# Altium PCB PCB_Z35_Sensors.PcbDoc
Units mm, origin at the board's own origin, x right, y up, seen from the top; angles counter-clockwise.
Board outline 19.94 x 36.96 mm, 2 copper layers (Top Layer, Bottom Layer), stack 1.671 mm thick; 9 components, 185 nets, 31 pads, 11 vias.
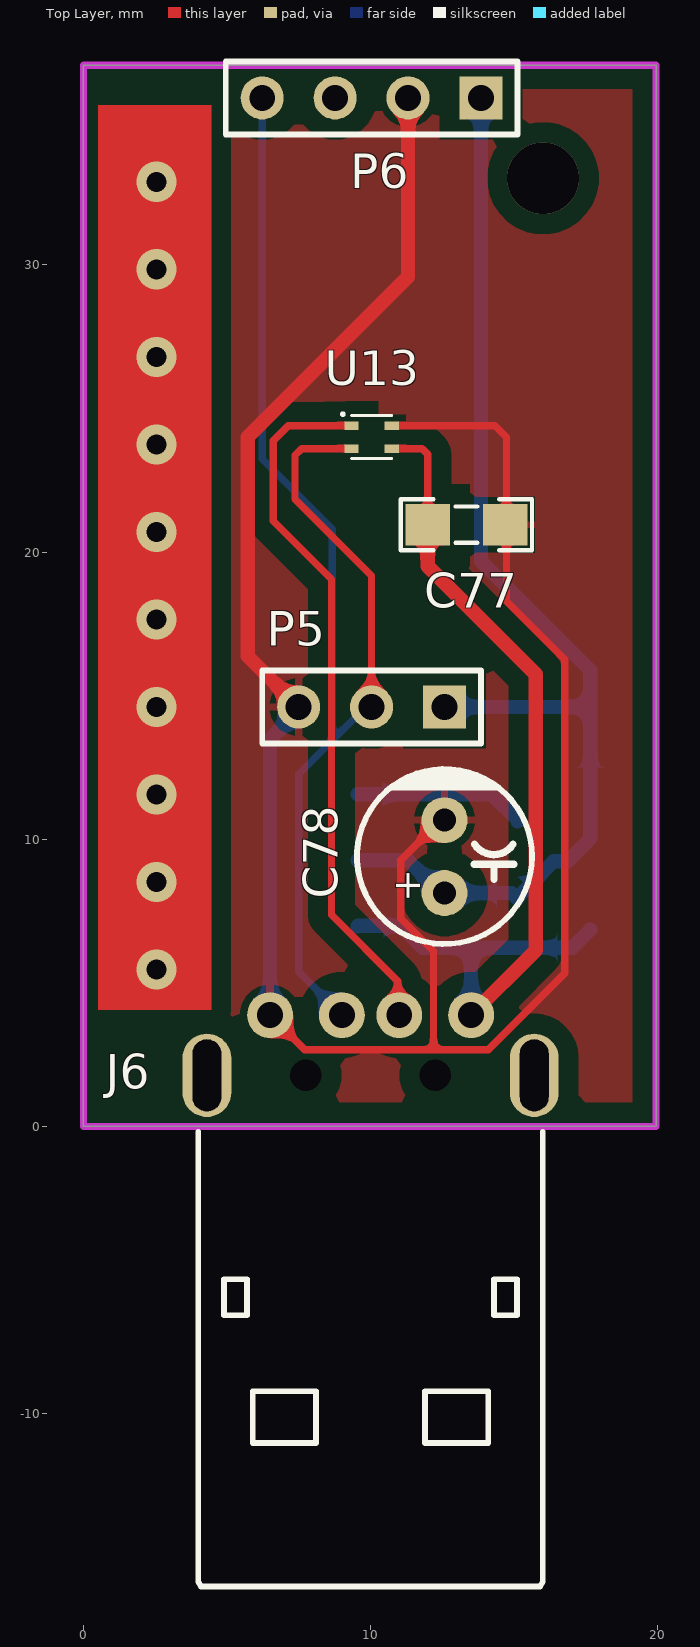
[diagram p0: Top Layer view]
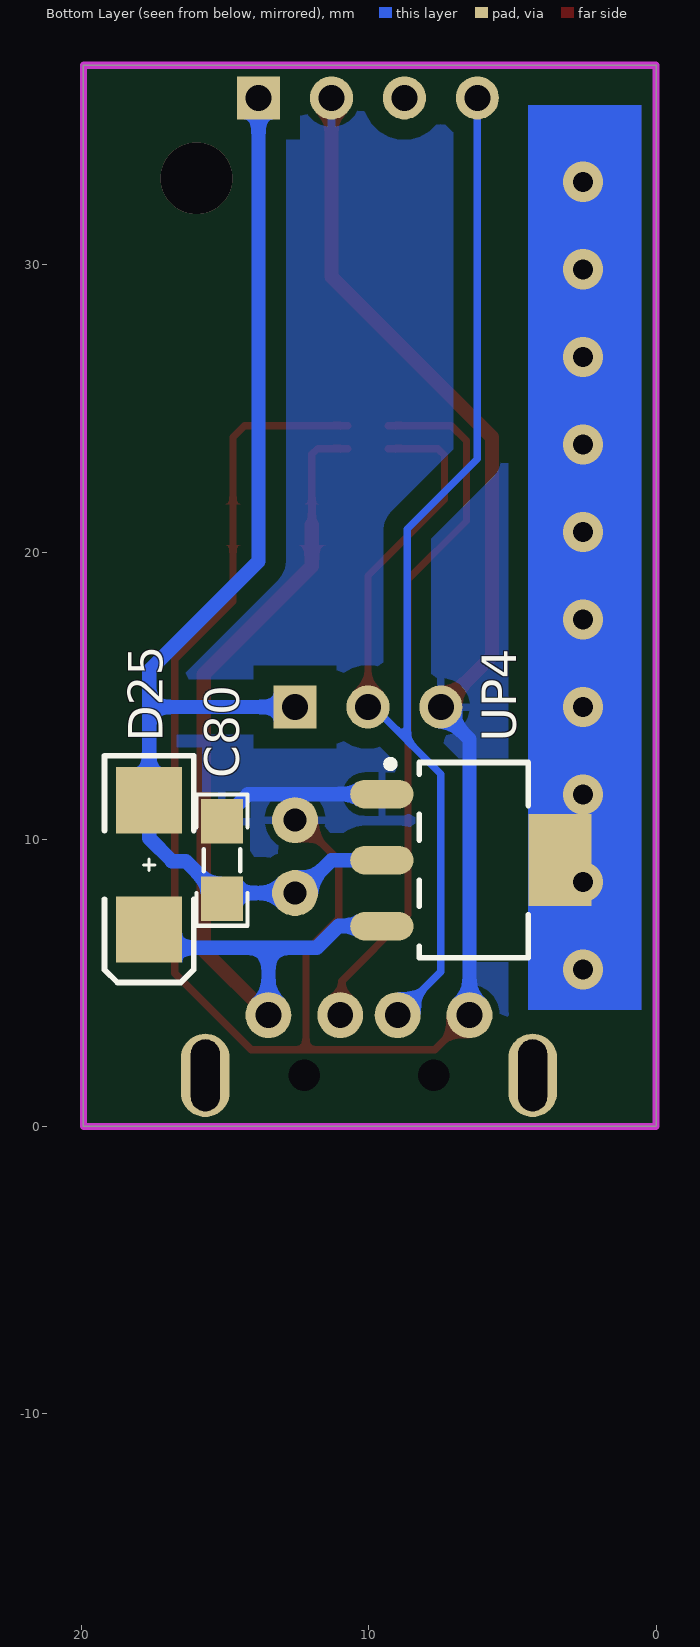
[diagram p1: Bottom Layer view, seen from below]

## Layer stack, top to bottom
Top Solder: solder mask 0.0102, Solder Resist, Dk 3.5
Top Layer: signal copper 0.0356
Dielectric 1: dielectric 1.6, FR-4, Dk 4.8
Bottom Layer: signal copper 0.0356
Bottom Solder: solder mask 0.0102, Solder Resist, Dk 3.5

## Board outline
0,0 19.939,0 19.939,36.957 0,36.957

## Design rules (kind name [scope] priority, off if disabled: settings)
Clearance [All] p1: gap=0.2 ignorepadtopadclearanceinfootprint=FALSE except(0.7: Arc-Poly Track-Poly SMDPad-Poly THPad-Poly Via-Poly Fill-Poly Poly-Poly Poly-Region Poly-Text Poly-Hole)
PolygonConnect [All] p1: thpad.connectstyle=Relief thpad.reliefconductorwidth=0.254 thpad.reliefentries=4 thpad.polygonreliefangle="90 Angle" thpad.airgapwidth=0.254 smdpad.connectstyle=Relief smdpad.reliefconductorwidth=0.254 smdpad.reliefentries=4 smdpad.polygonreliefangle="90 Angle" smdpad.airgapwidth=0.254 via.connectstyle=Direct via.reliefconductorwidth=0.254 via.reliefentries=4 via.polygonreliefangle="90 Angle" via.airgapwidth=0.254
RoutingVias [All] p1: holewidth=0.711 width=1.27 viastyle="Through Hole" minholewidth=0.711 minwidth=1.27 maxholewidth=4 maxwidth=5
SolderMaskExpansion [All] p1: expansion=0.102 istentingtop=FALSE
SupplyNets "Schematic Supply Nets_4" [InNet('GND-12v')] p1: voltage=0.000
SupplyNets "Schematic Supply Nets_3" [InNet('GND-3.3v')] p2: voltage=0.000
SupplyNets "Schematic Supply Nets_2" [InNet('+5')] p3: voltage=0.000
SupplyNets "Schematic Supply Nets_1" [InNet('GND')] p4: voltage=0.000
SupplyNets "Schematic Supply Nets" [InNet('3.3v')] p5: voltage=0.000
Width [All] p1: maxlimit=2 minlimit=0.254 preferedwidth=0.254 minimp=50.000000 maximp=50.000000 favimp=50.000000
30 further rules are at their usual default settings.

## Components (designator, comment, footprint, x,y, rotation, side; value= is the part's Value field where it differs from the comment)
C77 "100nF" CAPC3413X12N 13.335,20.955 r0 top
C78 "10uF" "Cap electrolitic radial 6.3x12-2.5" 12.573,8.128 r90 top value=1uF
C80 "100nF" CAPC3413X12N 15.113,9.271 r90 bottom
D25 "SMD 1N4007" "DIODE SMD" 17.653,11.358 r270 bottom
J6 "USB" MOLEX_48037-0001 9.997,3.878 r0 top
P5 "Header 3" HDR1X3 12.573,14.605 r180 top
P6 "Header 4" HDR1X4 13.843,35.814 r180 top
U13 "SHT40" SHT4X 10.033,24.003 r0 top
UP4 "5v" SOT223 6.35,9.271 r180 bottom

## Footprints (in the part's own frame and the unit in brackets; to place one, negate y for a bottom-side part, rotate by r counter-clockwise, add the part's x,y. Pads: shape width x height; smd on the part's side, far side on the other; paste and mask are expansions set on the pad)
"Cap electrolitic radial 6.3x12-2.5" [mm] "Capacitor Electrolytic D=6.3 x H=12 - P=2.5 mm, Altium Compatible"
  round 1.6 hole 0.8: 1(0,0) 2(2.54,0)
  silkscreen extent -1.78,-3.05 4.32,3.04, body extent -1.87,-3.09 4.43,3.2, height 1.2
CAPC3413X12N [mm] "Chip Capacitor, 2-Leads, Body 3/40x1/30mm, IPC Medium Density-Design:Abbas Basereh"
  rect 1.55x1.45 smd: 1(-1.35,0) 2(1.35,0)
  silkscreen extent -2.29,-0.89 2.29,0.89, body extent -1,-0.62 1,0.63, height 0.78
"DIODE SMD" [mm]
  rect 2.3x2.3 smd: 1(0,0) 2(4.5,0)
  silkscreen extent -1.55,-1.55 6.35,1.55, body extent -0.28,-1.32 4.82,1.28, height 2.31
HDR1X3 [mm] "Connector; Header; 3 Position"
  rect 1.5x1.5 hole 0.9: 1(0,0)
  round 1.5 hole 0.9: 2(2.54,0) 3(5.08,0)
  silkscreen extent -1.27,-1.27 6.35,1.27, body extent -1.26,-1.27 6.36,1.27, height 8.38
HDR1X4 [mm] "Connector; Header; 4 Position"
  rect 1.5x1.5 hole 0.9: 1(0,0)
  round 1.5 hole 0.9: 2(2.54,0) 3(5.08,0) 4(7.62,0)
  silkscreen extent -1.27,-1.27 8.89,1.27, body extent -1.27,-1.28 8.89,1.26, height 8.38
MOLEX_48037-0001 [mm] "Right Angled Through Hole Shielded USB Plug, Type A"
  round 1.6 hole 0.9: 1(3.5,0) 2(1,0) 3(-1,0) 4(-3.5,0)
  oval 1.7x2.9 hole 1 slot 2.5 at 90 deg: 5(-5.7,-2.1) 5(5.7,-2.1)
  round 0.6 hole 1.1 unplated mask+0.25: MECH(-2.25,-2.1) MECH(2.25,-2.1)
  silkscreen extent -6,-19.9 6,-4.06, body extent -6.17,-19.9 6.17,0.13, height 3.07
SHT4X [mm]
  rect 0.5x0.3 smd: 1(-0.7,0.4) 2(-0.7,-0.4) 3(0.7,-0.4) 4(0.7,0.4)
  silkscreen extent -1.05,-0.75 0.7,0.85, body extent -0.75,-0.75 0.75,0.75, height 0.54
SOT223 [mm] "SOT223, 4-Leads, Body 6.5x3.5mm, Pitch 2.30mm-Designer Abbas Basereh"
  oval 2.2x1 smd: 1(-3.2,2.3) 2(-3.2,0) 3(-3.2,-2.3)
  rect 2.2x3.2 smd: 4(3,0)
  Top Layer pour cut-out: -1.7,3.556 1.7,3.556 1.7,-3.556 -1.7,-3.556
  silkscreen extent -3.03,-3.4 1.9,3.47, body extent -3.5,-3.25 3.5,3.25, height 1.7

## Part data
C77 C80: library part "CAP SMD 0805", "CAP 0805", Data=16-12-2016, Desc.="CAP SMD 0805", Designer="Abbas Basereh"
C78: library part "Cap ELECTROLITIC TOTAL SIZE", "Cap electrolitic radial", Data=16-12-2016, Designer="Abbas Basereh"
D25: library part "Diode SMD Package", "Diode SMD Pakage"
J6: library part MOLEX_48037-0001, "4 Pin + 1 Shield USB Receptacle", Manufacturer=MOLEX, Manufacturer Part Number=48037-0001, Author="CERN DEM JLC", Component Type=Standard, ComponentHeight=4.6mm, CreateDate=8/28/2014, Family=USB, HelpURL=\\cern.ch\dfs\Applications\Altium\Datasheets\MOLEX_48037-0001.pdf, LatestRevisionDate=8/28/2014, Mounted=Yes, Part Description="Right Angled Through Hole Shielded USB Plug, Type A", Part Number=MOLEX_48037-0001, Pin Count=6, PressFit=No, Sense=No, SMD=No, Socket=No, Status=None
P5: "Header, 3-Pin", LatestRevisionDate=17-Jul-2002, LatestRevisionNote="Re-released for DXP Platform.", Publisher="Altium Limited"
P6: "Header, 4-Pin", LatestRevisionDate=17-Jul-2002, LatestRevisionNote="Re-released for DXP Platform.", Publisher="Altium Limited"
U13: library part SHT4X, "Digital Relative Humidity Temperature Sensor, Â±1.8 / max 3.5 %RH, Â±0.2 Â°C, Ultra-Low-Power", Package=None, Availability="In Stock", Check_prices=https://www.snapeda.com/parts/SHT40-AD1B-R2/Sensirion/view-part/?ref=eda, MF=Sensirion, MP=SHT40-AD1B-R2, PRICE=None, Purchase-URL=https://pricing.snapeda.com/search/part/SHT40-AD1B-R2/?ref=eda, SnapEDA_Link=https://www.snapeda.com/parts/SHT40-AD1B-R2/Sensirion/view-part/?ref=snap
UP4: library part AMS1117-x.x, "x.x Volt, 800mA Low-Dropout Linear Regulator, 4-pin SOT-223", Data=16-12-2016, Designer="Ali Hafizi"

## Via types
v1: diameter 1.4, hole 0.7, Top Layer to Bottom Layer, 10 vias
v2: diameter 2.5, hole 2.5, Top Layer to Bottom Layer, 1 vias

## Nets (pads, with @x,y where several pads share a name; then routed paths per layer and width w, separated by ;. In a path a pad name is that pad's centre, name@x,y a point inside that pad or via, vN(x,y) a via of type N, cw(c..) or ccw(c..) an arc to the next point about the centre after c; other vN are vias at no path point)
3.3v: 
"3.3v / 12v": C77.1 D25.2 J6.1 U13.3 UP4.3 | length 34.4
  Top Layer w0.254: U13.3 11.792,23.603 11.985,23.41 C77.1
  Top Layer w0.5: C77.1 11.985,19.511 15.748,15.748 15.748,6.129 J6.1
  Bottom Layer w0.5: UP4.3 9.564,6.985 11.049,6.985 11.811,6.223 13.497,6.223 ; J6.1 13.497,6.223 ; D25.2 17.018,6.223 13.497,6.223
"3.3v Keys": 
"5v B1205": 
+5: C78.1 C80.1 D25.1 P5.1 P6.1 UP4.2 | length 42
  Bottom Layer w0.5: UP4.2 11.303,9.271 12.446,8.128 C78.1 14.906,8.128 C80.1 15.113,7.971 16.382,9.24 16.86,9.24 17.653,10.033 D25.1 17.653,14.605 ; P5.1 17.653,14.605 ; P6.1 13.843,19.685 17.653,15.875 17.653,14.605
+12v: 
"+12v Adopter": 
+12v_Sun_LED: 
ADC1: 
ADC2: 
ADC3: 
ADC4: 
Bat+: 
Bat-: 
Blink: 
"CE - NRF": 
"Charge En": 
"CO2 IN 1": 
"CO2 IN 2": 
Cooler: 
"Cooler out": 
"CSN - NRF": 
"CSN - W25": 
D4: 
D5: 
D6: 
D7: 
"Day lamp": 
"Day lamp out": 
"Down button": 
"Down button K": 
E: 
"ESP 3.3v": 
fuse: 
"Gas heater": 
"Gas heater out": 
GND: C77.2 C78.2 C80.2 J6.4 P5.3 P6.2 U13.4 UP4.1 | length 86.1
  Top Layer w0.254: J6.4 7.708,2.667 12.192,2.667 ; U13.4 14.332,24.403 14.732,24.003 14.732,18.288 16.764,16.256 16.764,5.334 14.097,2.667 12.192,2.667 ; C78.2 12.446,10.668 11.049,9.271 11.049,7.239 12.192,6.096 12.192,2.667
  Top Layer w0.5: P5.3 5.715,16.383 5.715,24.003 11.303,29.591 P6.2
  Bottom Layer w0.5: J6.4 6.497,13.48 7.493,14.476 P5.3 ; UP4.1 14.213,11.571 15.113,10.671 C80.2
GND-3.3v: 
GND-12v: 
GND_Sun_LED: 
Heater: 
"Heater out": 
Humidity: 
"Humidity out": 
input1: 
input2: 
input3: 
input4: 
input5: 
input6: 
input7: 
"IRQ - NRF": 
N220: 
NetC3_1: 
NetC4_1: 
NetC10_1: 
NetC12_1: 
NetC12_2: 
NetC36_1: 
NetC42_1: 
NetC53_1: 
NetC54_1: 
NetC57_1: 
NetC63_1: 
NetC70_1: 
NetC71_1: 
NetC72_1: 
NetC75_1: 
NetCR1_3: 
NetD1_1: 
NetD2_1: 
NetD3_1: 
NetD4_1: 
NetD5_1: 
NetD6_1: 
NetD8_1: 
NetD9_1: 
NetD11_2: 
NetD13_1: 
NetD15_2: 
NetD19_1: 
NetD21_1: 
NetD21_2: 
NetD23_1: 
NetD25_2: 
NetDZ1_1: 
NetIC1_1: 
NetIC2_1: 
NetIC3_1: 
NetIC4_1: 
NetIC5_1: 
NetIC6_1: 
NetIC7_1: 
NetIC9_1: 
NetIC9_4: 
NetIC10_1: 
NetIC10_2: 
NetIC11_9: 
NetIC11_14: 
NetL2_1: 
NetL2_2: 
NetLD1_1: 
NetLD2_1: 
NetMOC1_1: 
NetMOC1_6: 
NetMos1_1: 
NetQ1_1: 
NetQ2_1: 
NetQ4_1: 
NetQ5_1: 
NetQ6_1: 
NetQ6_3: 
NetQ7_1: 
NetQ7_4: 
NetQ7_5: 
NetR17_1: 
NetR28_1: 
NetR30_1: 
NetR32_1: 
NetR37_2: 
NetR60_1: 
NetR61_1: 
NetR62_1: 
NetR71_1: 
NetR72_1: 
NetR73_2: 
NetR76_1: 
NetRL1_12: 
NetRL2_12: 
NetSp1_1: 
NetSp1_2: 
"Night lamp": 
"Night lamp out": 
NRST: 
OSC32_IN: 
OSC32_OUT: 
OSC_IN: 
OSC_OUT: 
output1: 
output2: 
output3: 
output4: 
output5: 
output6: 
output7: 
P220: 
PAM8403: 
"PAM8403 STM32": 
RS: 
RW: 
"RXD ESP32": 
"RXD GSM": 
SCL: 
SCL_ADC_PIR: J6.3 P5.2 P6.4 U13.2 | length 47.8
  Top Layer w0.254: U13.2 7.601,23.603 7.366,23.368 7.366,21.844 10.033,19.177 P5.2
  Bottom Layer w0.254: P6.4 6.223,23.241 8.661,20.803 8.661,13.438 ; J6.3 7.493,5.382 7.493,12.27 8.661,13.438 ; P5.2 9.828,14.605 8.661,13.438
SDA: J6.2 U13.1 | length 24.8
  Top Layer w0.254: U13.1 7.131,24.403 6.604,23.876 6.604,21.082 8.636,19.05 8.636,7.366 10.943,5.059 10.943,3.932 J6.2
"Setting button 1": 
"Setting button 1 K": 
"Setting button 2": 
"Setting button 2 K": 
"SPI2 MISO": 
"SPI2 MOSI": 
"SPI2 SCK": 
"Status botton": 
Sun: 
"Sun 12v LED": 
"Sun out": 
SWCLK: 
SWDIO: 
"Tab 3.3 stm32": 
"Tab 5v": UP4.4
  other v1: 2.54,5.461 2.54,8.509 2.54,11.557 2.54,14.605 2.54,17.653 2.54,20.701 2.54,23.749 2.54,26.797 2.54,29.845 2.54,32.893
"Timer 1": 
"Timer 1 out": 
"Timer 2": 
"Timer 2 out": 
"TXD ESP32": 
"TXD GSM": 
"UART4 RX - ESP32": 
"UART4 TX - ESP32": 
"Up button": 
"Up button K": 
"USART1 RX - GSM": 
"USART1 TX - GSM": 
VBAT: 
VEE: 
"Voltage detect": 
pads on no net: J6.5 J6.MECH P6.3
copper on no net:
  other v2: 16.002,33.02

## Polygon pours and split planes (outlines as drawn)
GND on Top Layer "GND_L01_P000" (solid, remove dead copper, pour order 0): 0,36.957 19.939,36.957 19.939,0 0,0
GND on Bottom Layer "GND_L02_P002" (solid, remove dead copper, pour order 2): 0,36.957 19.939,36.957 19.939,0 0,0

## Keep-outs
Keep-Out Layer:
  the board outline again, w0.254

## Other copper
Top Layer:
  region net "Tab 5v": 4.445,4.064 0.508,4.064 0.508,35.56 4.445,35.56 4.445,8.001
Bottom Layer:
  region net "Tab 5v": 4.445,4.064 0.508,4.064 0.508,35.56 4.445,35.56 4.445,8.001

## Silkscreen, mask and mechanical layers (free items; w line width, h text height)
Top Solder:
  region: 4.445,4.064 0.508,4.064 0.508,35.56 4.445,35.56 4.445,8.001
  lines w0.254: 8.255,23.622 9.271,23.622 ; 8.255,24.384 9.144,24.384 ; 10.795,23.622 11.811,23.622 ; 10.795,24.384 11.811,24.384
Bottom Solder:
  region: 4.445,4.064 0.508,4.064 0.508,35.56 4.445,35.56 4.445,8.001

## Dimensions
0,36.957 to 0,0 on Mechanical 1
19.939,36.957 to 0,36.957 on Mechanical 1

## Text inside footprints (layer, text, board x,y; h text height)
C78: Top Overlay "+" at 11.733,7.808 h1 r90